# Altium PCB Eth_PoE.PcbDoc (part 1 of 3)
Units mm, origin at the board's own origin, x right, y up, seen from the top; angles counter-clockwise.
Board outline 33 x 53 mm, 2 copper layers (Top Layer, Bottom Layer), stack 0.97 mm thick; 81 components, 62 nets, 294 pads, 109 vias.
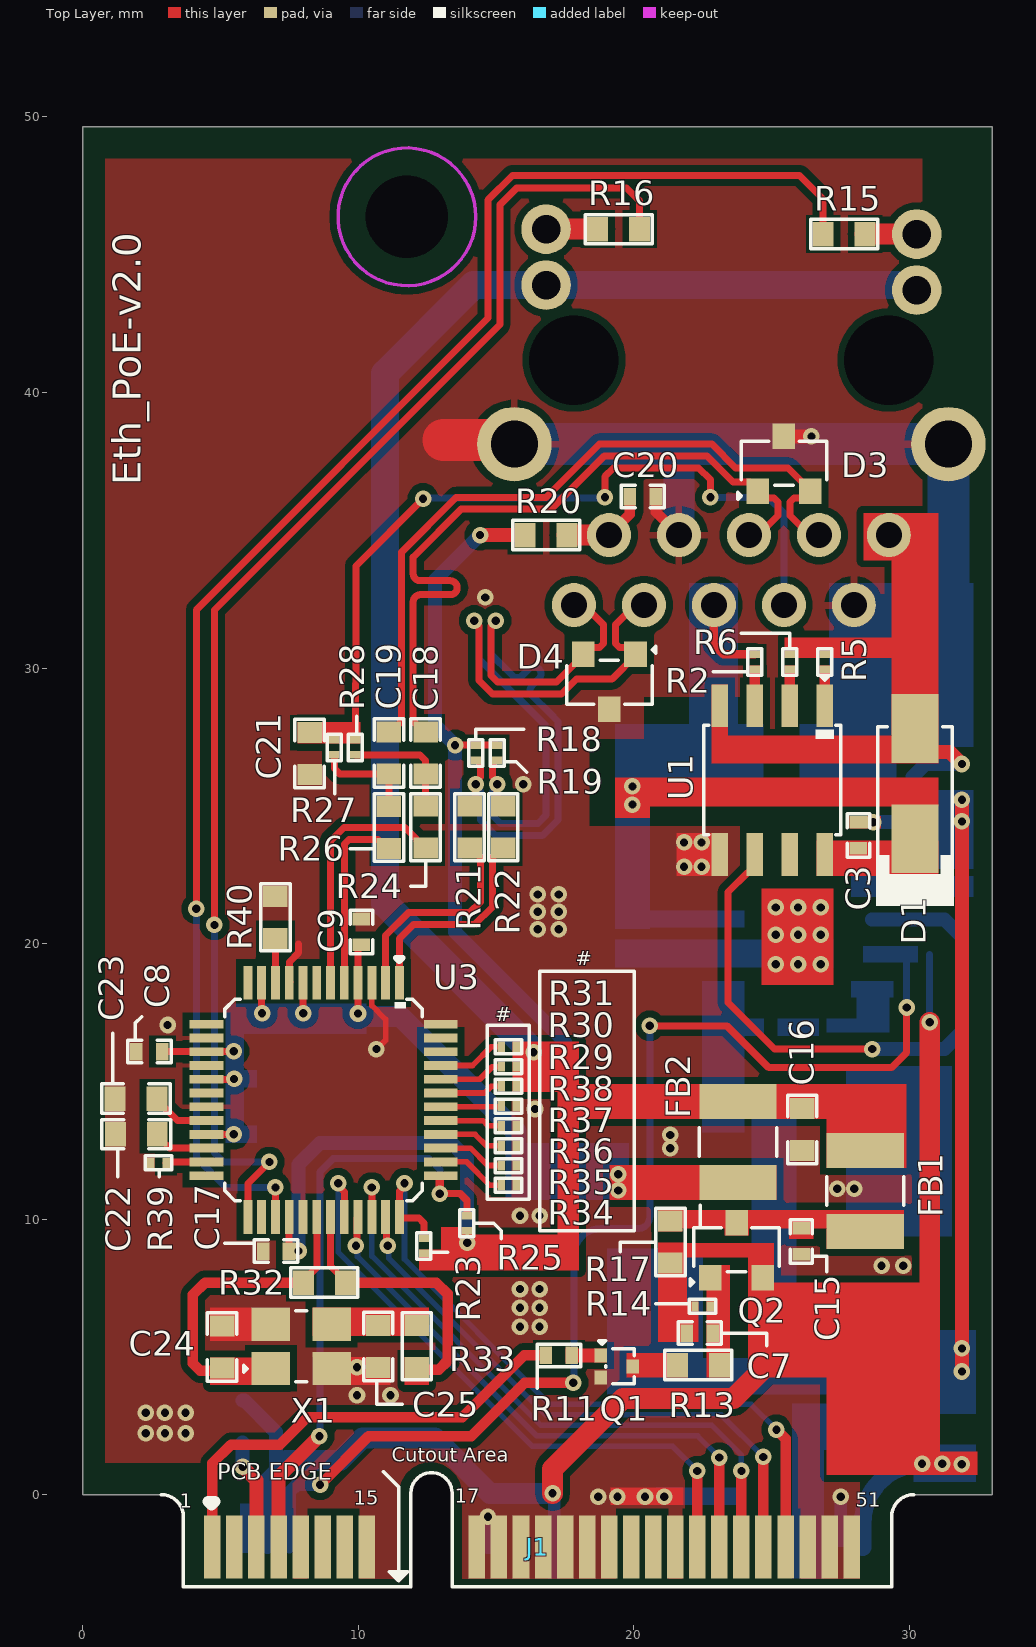
[diagram p0: Top Layer view]
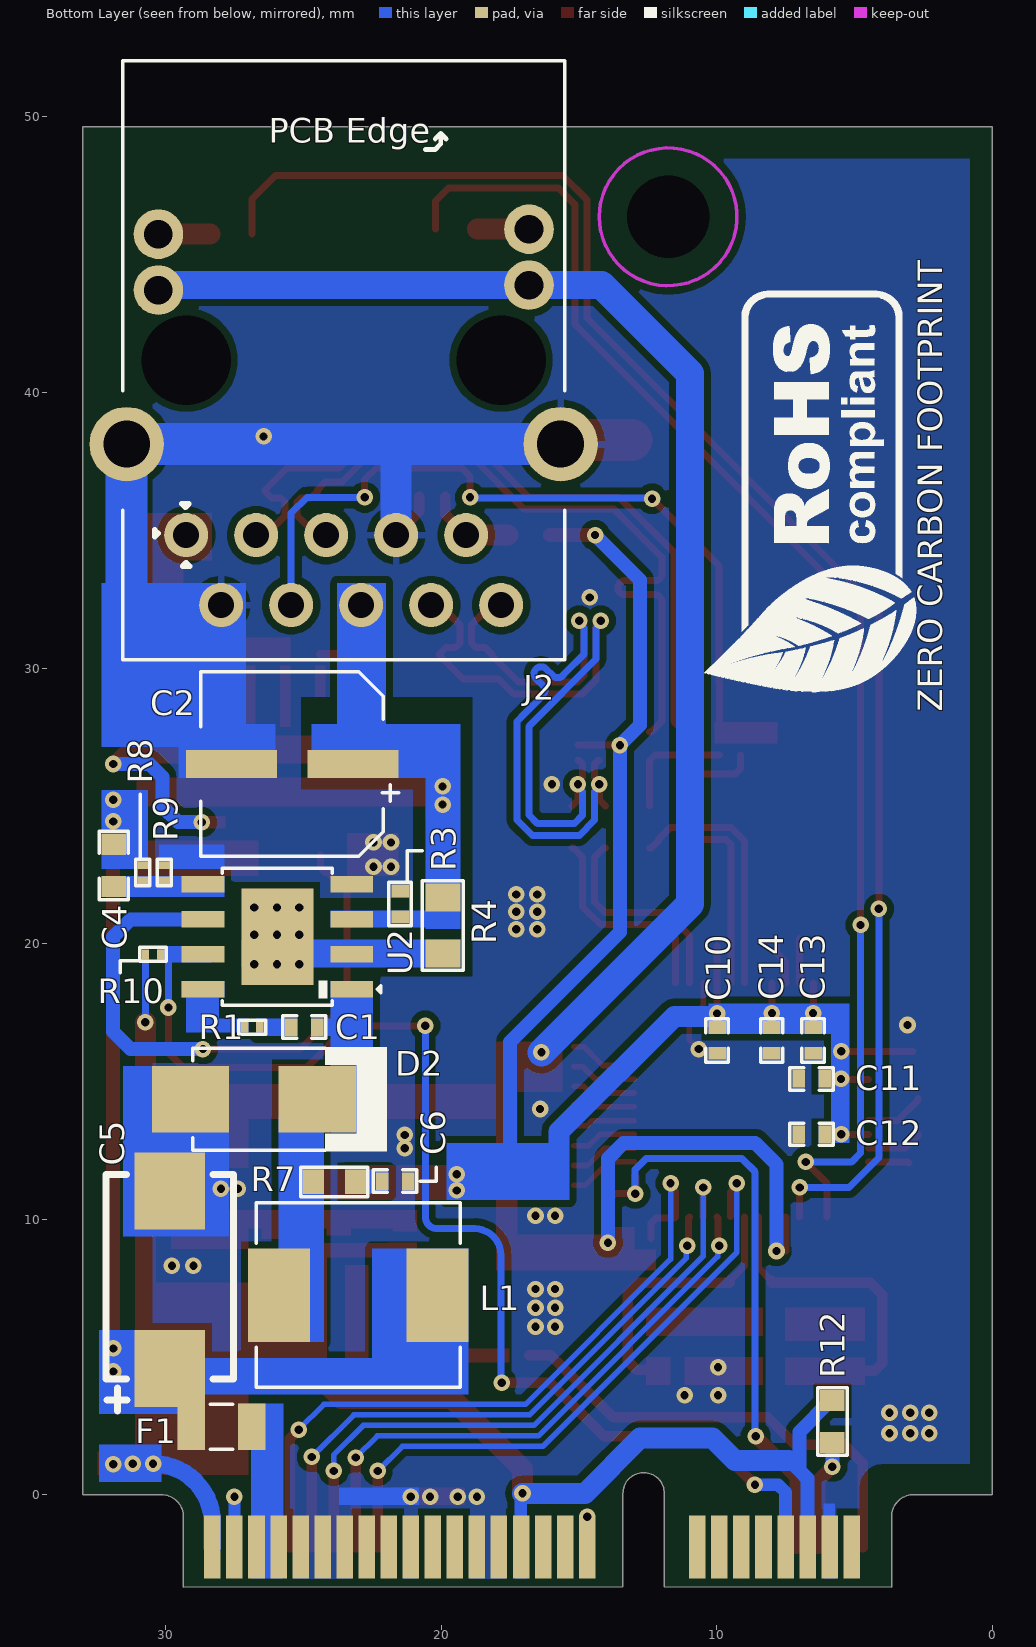
[diagram p1: Bottom Layer view, seen from below]
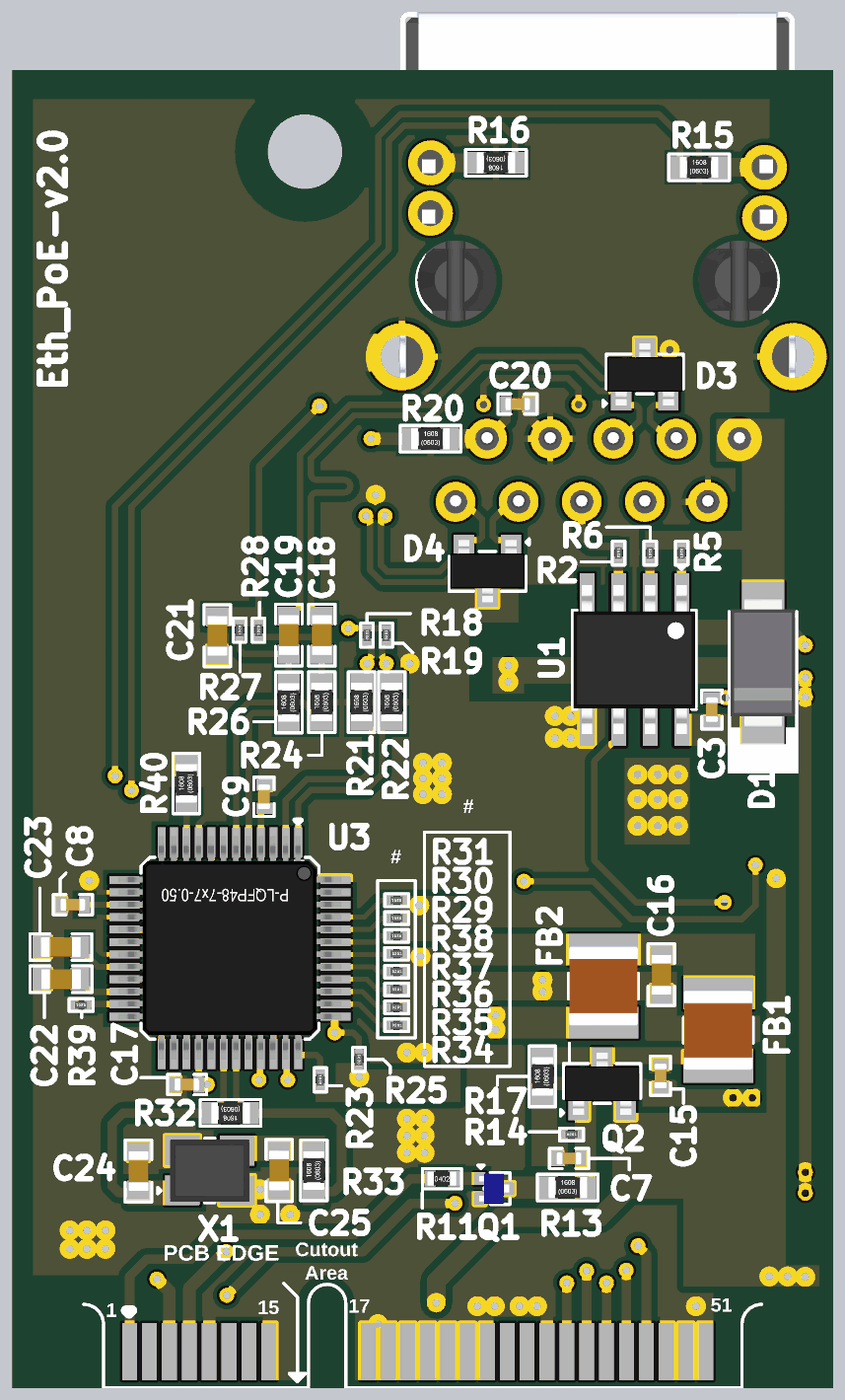
[diagram p3: 3D render of the assembled board from above, using the file's embedded part models]
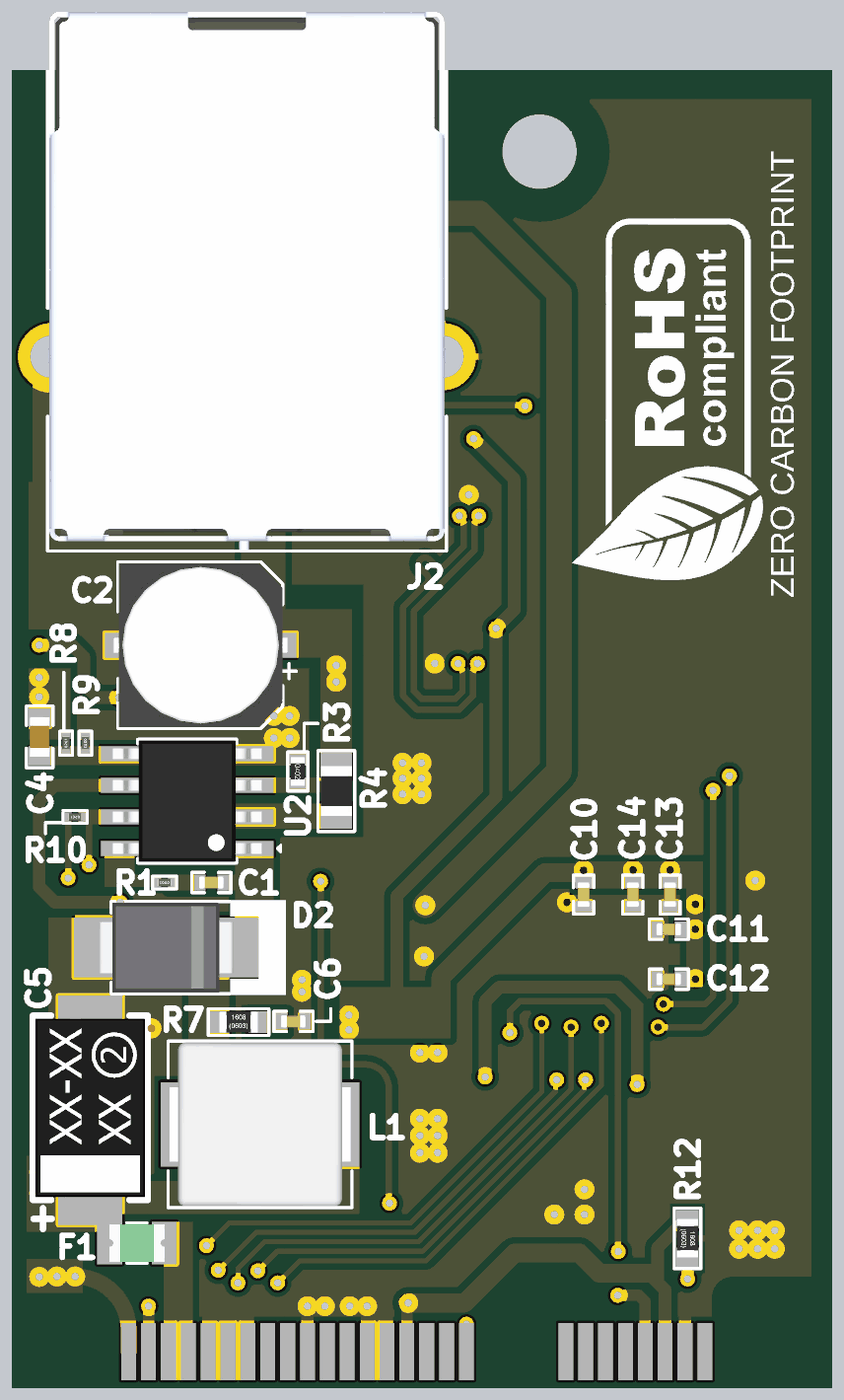
[diagram p4: 3D render of the assembled board from below, using the file's embedded part models]

## Layer stack, top to bottom
Top Solder: solder mask 0.015, Solder Resist, Dk 3.5
Top Layer: signal copper 0.035
Dielectric 1: core 0.9, FR-4, Dk 4.8
Bottom Layer: signal copper 0.035
Bottom Solder: solder mask 0.015, Solder Resist, Dk 3.5

## Board outline
3.65,-3.355 3.65,-0.8 ccw(c2.85,-0.8) 2.85,0 0,0 0,49.642 33,49.642 33,0 30.15,0 ccw(c30.15,-0.8) 29.35,-0.8 29.35,-3.355 13.399,-3.35 13.399,-3.349 13.4,0.051 ccw(c12.65,0.051) 11.9,0.051 11.899,-3.349 11.899,-3.35

## Design rules (kind name [scope] priority, off if disabled: settings)
Clearance Clearance_1 [All] p1: gap=0.178 ignorepadtopadclearanceinfootprint=FALSE except(0.127: Arc-SMDPad Track-SMDPad SMDPad-SMDPad; 0.254: Arc-Fill Arc-Poly Arc-Region Track-Fill Track-Poly Track-Region SMDPad-Fill SMDPad-Poly SMDPad-Region THPad-Fill THPad-Poly THPad-Region Via-Fill Via-Poly Via-Region Fill-Fill Fill-Poly Fill-Region Poly-Poly Poly-Region Region-Region)
DiffPairsRouting [InDifferentialPairClass('EtherCAT_A_Lines')] p1: maxlimit=0.178 minlimit=0.178 mostfreqgap=0.178 toplayer_minwidth=0.254 toplayer_maxwidth=0.254 toplayer_prefwidth=0.254 bottomlayer_minwidth=0.254 bottomlayer_maxwidth=0.254 bottomlayer_prefwidth=0.254 impedanceprofiledriven=TRUE impedanceprofileid={0F1BC98E-E2DE-4F10-A1ED-F719CD41595E} impedanceprofilevalue=100.000000 maxuncoupledlength=25.4
HoleSize [All] p1: absolutevalues=TRUE maxlimit=25.4 minlimit=0.025 maxpercent=80.000 minpercent=20.000
HoleToHoleClearance [All] p1: gap=0 allowstackedmicrovias=TRUE
MatchedLengths "Schematic Matched Net Lengths" [InNetClass('EtherCAT_A')] p1: tolerance=0.508 checknetsindiffpair=FALSE checkdiffpairvsdiffpair=TRUE checkxsignals=TRUE checkothers=TRUE
MaxMinImpedance "Schematic Impedance Constraint" [InNetClass('EtherCAT_A')] p1: minimum=85.00 maximum=95.00
MinimumSolderMaskSliver [All] p1: minsoldermaskwidth=0
PolygonConnect [All] p1: thpad.connectstyle=Relief thpad.reliefconductorwidth=0.254 thpad.reliefentries=4 thpad.polygonreliefangle="90 Angle" thpad.airgapwidth=0.254 smdpad.connectstyle=Direct smdpad.reliefconductorwidth=0.254 smdpad.reliefentries=4 smdpad.polygonreliefangle="90 Angle" smdpad.airgapwidth=0.254 via.connectstyle=Direct via.reliefconductorwidth=0.254 via.reliefentries=4 via.polygonreliefangle="90 Angle" via.airgapwidth=0.254
RoutingVias [All] p1: holewidth=0.3 width=0.6 viastyle="Through Hole" minholewidth=0.3 minwidth=0.6 maxholewidth=0.8 maxwidth=1.6
SilkToSilkClearance [All] p1: silktosilkclearance=0
SilkToSolderMaskClearance [IsPad] p1: minsilkscreentomaskgap=0 clearancetoexposedcopper=TRUE
SolderMaskExpansion [All] p1: expansion=0.102 istentingtop=FALSE
Width [All] p1: maxlimit=2.54 minlimit=0.203 preferedwidth=0.305 minimp=50.000000 maximp=50.000000 favimp=50.000000
24 further rules are at their usual default settings.

## Classes and differential pairs
differential pair class EtherCAT_A_Lines: RD RX TD TX
net class EtherCAT_A: RD_N RD_P TD_N TD_P
component class U_EthPoE_Sheet: C1 C2 C3 C4 C5 C6 D1 D2 F1 J1 L1 R1 R2 R3 R4 R5 R6 R7 R8 R9 R10 R12 SSS U1 U2
component class U_Ethernet_Sheet_W5500: C7 C8 C9 C10 C11 C12 C13 C14 C15 C16 C17 C18 C19 C20 C21 C22 C23 C24 C25 D3 D4 FB1 FB2 J2 Q1 Q2 R11 R13 R14 R15 R16 R17 R18 R19 R20 R21 R22 R23 R24 R25 R26 R27 R28 R29 R30 R31 R32 R33 R34 R35 R36 R37 R38 R39 R40 U3 X1
differential pair TD: +TD_P -TD_N
differential pair RD: +RD_P -RD_N

## Components (designator, comment, footprint, x,y, rotation, side; value= is the part's Value field where it differs from the comment)
C1 "0.1uF" CAP-0402 24.968,16.967 r0 bottom
C2 "15uF" VMMC0571J150MV 25.4,26.518 r0 bottom
C3 "0.1uF" CAP-0402 28.143,23.927 r270 top
C4 "12pF" CAP-0603 31.881,22.83 r90 bottom
C5 "470uF" CASE-E 29.845,4.584 r90 bottom
C6 "220pF" CAP-0402 21.666,11.379 r0 bottom
C7 "22nF" CAP-0402 22.388,5.867 r180 top
C8 "0.1uF" CAP-0402 2.413,16.078 r0 top
C9 "0.1uF" CAP-0402 10.109,20.422 r270 top
C10 "0.1uF" CAP-0402 9.982,16.485 r90 bottom
C11 "0.1uF" CAP-0402 6.553,15.088 r180 bottom
C12 "0.1uF" CAP-0402 6.553,13.081 r180 bottom
C13 "0.1uF" CAP-0402 6.502,16.485 r90 bottom
C14 "0.1uf" CAP-0402 8.001,16.485 r90 bottom
C15 "22nF" CAP-0402 26.07,9.193 r90 top
C16 "10uF" CAP-0603 26.108,13.258 r90 top
C17 "0.1uF" CAP-0402 7.01,8.839 r0 top
C18 "6.8nF" CAP-0603 12.436,26.924 r270 top
C19 "6.8nF" CAP-0603 11.108,26.924 r270 top
C20 "22nF" CAP-0402 20.32,36.22 r180 top
C21 "10nF" CAP-0603 8.23,26.899 r90 top
C22 "10nF" CAP-0603 1.937,13.081 r0 top
C23 "4.7uF" CAP-0603 1.93,14.377 r0 top
C24 "12pF" CAP-0603 5.055,5.36 r270 top
C25 "12pF" CAP-0603 10.719,5.385 r90 top
D1 "SMAJ58A" SMA 30.201,25.806 r90 top
D2 "SS510B" SMB_ 26.797,14.351 r180 bottom
D3 "SP0502BAHTG" SOT-23 25.441,37.414 r0 top
D4 "SP0502BAHTG" SOT-23 19.107,29.501 r180 top
F1 "BSMD0805L-200" FUSE-0805 27.965,2.464 r180 bottom
FB1 "FBMH3225HM601NT" IND-1210 28.397,11.024 r90 top
FB2 "FBMH3225HM601NT" IND-1210 23.774,12.802 r270 top
J1 "Mini PCIe" "MINI PCIE PAD" 4.7,-1.9 r0 top locked
J2 "ARJM11D7-114-AB-EW2" ARJM11D7-114-AB-EW2 23.536,39.106 r0 bottom locked
L1 "33uH" MDA7050_330M 23.012,7.239 r180 bottom
Q1 "MMBT3904M" SOT-723 19.375,4.655 r270 top
Q2 "FDN306P" SOT-23 23.723,8.872 r0 top
R1 "4.7R" RES-0201 26.853,16.967 r0 bottom
R2 "24.9K" RES-0201 24.384,30.226 r90 top value=24.9kR
R3 "4.7K" RES-0402 21.488,21.438 r270 bottom
R4 "30mR" RES-0805 19.939,20.65 r90 bottom
R5 "180K" RES-0201 26.924,30.226 r270 top value=180kR
R6 "4.42K" RES-0201 25.654,30.226 r270 top
R7 "22R" RES-0603 23.876,11.354 r0 bottom
R8 "300K" RES-0201 30.82,22.576 r90 bottom value=300kR
R9 "57.6K" RES-0201 30.045,22.576 r270 bottom value=57.6kR
R10 "10K" RES-0201 30.455,19.609 r0 bottom
R11 "4.7K" Res-0402 17.272,5.055 r0 top
R12 "0R" Res-0603 5.8,2.655 r90 bottom
R13 "1K" RES-0603 22.337,4.699 r180 top
R14 "10K" RES-0201 22.49,6.833 r0 top
R15 "330R" RES-0603 27.626,45.746 r180 top
R16 "330R" RES-0603 19.446,45.926 r0 top
R17 "0R" RES-0603 21.321,9.167 r270 top
R18 "49.9R" RES-0201 14.257,26.924 r90 top
R19 "49.9R" RES-0201 15.034,26.924 r90 top
R20 "10R" RES-0603 16.815,34.826 r180 top
R21 "33R" RES-0603 14.036,24.224 r270 top
R22 "33R" RES-0603 15.255,24.224 r270 top
R23 "10K" RES-0201 12.378,9.03 r90 top
R24 "33R" RES-0603 12.436,24.224 r270 top
R25 "10K" RES-0201 13.931,9.851 r90 top
R26 "33R" RES-0603 11.108,24.214 r270 top
R27 "49.9R" RES-0201 9.126,27.123 r270 top
R28 "49.9R" RES-0201 9.888,27.123 r270 top
R29 "10K" RES-0201 15.453,14.819 r180 top
R30 "10K" RES-0201 15.453,15.538 r180 top
R31 "10K" RES-0201 15.453,16.256 r180 top
R32 "1M" RES-0603 8.763,7.696 r0 top
R33 "0R" RES-0603 12.116,5.385 r270 top
R34 "10K" RES-0201 15.453,11.227 r0 top
R35 "10K" RES-0201 15.453,11.945 r0 top
R36 "10K" RES-0201 15.453,12.664 r0 top
R37 "10K" RES-0201 15.453,13.382 r0 top
R38 "10K" RES-0201 15.453,14.101 r0 top
R39 "10K" RES-0201 2.743,12.04 r180 top
R40 "12.4K" RES-0603 6.985,20.955 r270 top
U1 "TPS2375DR" SOIC-8 25.019,25.933 r270 top
U2 "TX4138" 8-SOIC-EP 25.943,20.244 r0 bottom
U3 "W5500" "48-LQFP (7X7)_" 8.738,14.326 r270 top locked
X1 "25MHZ" NX3225GA-25MHZ-STD-CRG-2 7.925,5.385 r0 top

## Footprints (in the part's own frame and the unit in brackets; to place one, negate y for a bottom-side part, rotate by r counter-clockwise, add the part's x,y. Pads: shape width x height; smd on the part's side, far side on the other; paste and mask are expansions set on the pad)
8-SOIC-EP [mm]
  rect 1.55x0.6 smd: 1(-2.7,1.905) 2(-2.7,0.635) 3(-2.7,-0.635) 4(-2.7,-1.905) 5(2.7,-1.905) 6(2.7,-0.635) 7(2.7,0.635) 8(2.7,1.905)
  rect 2.613x3.502 smd: 9(0,0)
  silkscreen extent -3.76,-2.49 1.99,2.49, body extent -3,-2.45 3,2.45, height 1.7
"48-LQFP (7X7)_" [mm]
  rect 1.22x0.32 smd: 1(-4.25,2.75) 2(-4.25,2.25) 3(-4.25,1.75) 4(-4.25,1.25) 5(-4.25,0.75) 6(-4.25,0.25) 7(-4.25,-0.25) 8(-4.25,-0.75) 9(-4.25,-1.25) 10(-4.25,-1.75) 11(-4.25,-2.25) 12(-4.25,-2.75) 25(4.25,-2.75) 26(4.25,-2.25) 27(4.25,-1.75) 28(4.25,-1.25) 29(4.25,-0.75) 30(4.25,-0.25) 31(4.25,0.25) 32(4.25,0.75) 33(4.25,1.25) 34(4.25,1.75) 35(4.25,2.25) 36(4.25,2.75)
  rect 0.32x1.22 smd: 13(-2.75,-4.25) 14(-2.25,-4.25) 15(-1.75,-4.25) 16(-1.25,-4.25) 17(-0.75,-4.25) 18(-0.25,-4.25) 19(0.25,-4.25) 20(0.75,-4.25) 21(1.25,-4.25) 22(1.75,-4.25) 23(2.25,-4.25) 24(2.75,-4.25) 37(2.75,4.25) 38(2.25,4.25) 39(1.75,4.25) 40(1.25,4.25) 41(0.75,4.25) 42(0.25,4.25) 43(-0.25,4.25) 44(-0.75,4.25) 45(-1.25,4.25) 46(-1.75,4.25) 47(-2.25,4.25) 48(-2.75,4.25)
  silkscreen extent -5.16,-3.58 3.66,3.58, body extent -4.51,-4.51 4.49,4.49, height 1.43
ARJM11D7-114-AB-EW2 [mm]
  round 1.6 hole 0.94: 1(5.715,4.28) 2(4.445,6.82) 3(3.175,4.28) 4(1.905,6.82) 5(0.635,4.28) 6(-0.635,6.82) 7(-1.905,4.28) 8(-3.175,6.82) 9(-4.445,4.28) 10(-5.715,6.82)
  round 1.8 hole 1.04: 11(6.725,-4.61) 12(6.725,-6.64) 13(-6.725,-4.79) 14(-6.725,-6.82)
  round 0 hole 3.25 unplated: MH1(-5.715,-2.07) MH2(5.715,-2.07)
  round 2.7 hole 1.7: SH1(-7.875,0.98) SH2(7.875,0.98)
  silkscreen extent -8.03,-12.93 8.03,8.8, body extent -7.99,-12.9 7.99,8.75, height 13.8
CAP-0402 [mil]
  rect 18x25 smd mask+2.36: 1(-18.5,0) 2(18.5,0)
  silkscreen extent -31,-16 31,16, body extent -20,-10 20,10, height 19
CAP-0603 [mil]
  rect 30x35 smd mask+2.36: 1(-30,0) 2(30,0)
  silkscreen extent -49,-21 49,21, body extent -32,-16 31,16, height 34
CASE-E [mm]
  rect 2.79x2.57 smd: 1(0,0) 2(6.44,0)
  silkscreen extent -1.56,-2.31 7.03,2.31, body extent -0.27,-2.21 6.92,2.21, height 2.88
FUSE-0805 [mm]
  rect 1x1.7 smd: 1(-1.1,0) 2(1.1,0)
  silkscreen extent -0.41,-0.81 0.41,0.81, body extent -1.1,-0.75 1.1,0.75, height 1.24
IND-1210 [mm]
  rect 1.27x2.81 smd: 1(-1.471,0) 2(1.471,0)
  silkscreen extent -0.52,-1.4 0.52,1.4, body extent -1.6,-1.4 1.6,1.4, height 2.5
MDA7050_330M [mm]
  rect 2.25x3.4 smd: 1(-2.875,0) 2(2.875,0)
  silkscreen extent -3.7,-3.35 3.7,3.35, body extent -3.65,-3.3 3.65,3.3, height 4.5
"MINI PCIE PAD" [mm]
  rect 0.6x2.3 smd: 1(0,0) 3(0.8,0) 5(1.6,0) 7(2.4,0) 9(3.2,0) 11(4,0) 13(4.8,0) 15(5.6,0) 17(9.6,0) 19(10.4,0) 21(11.2,0) 23(12,0) 25(12.8,0) 27(13.6,0) 29(14.4,0) 31(15.2,0) 33(16,0) 35(16.8,0) 37(17.6,0) 39(18.4,0) 41(19.2,0) 43(20,0) 45(20.8,0) 47(21.6,0) 49(22.4,0) 51(23.2,0)
  rect 0.6x2.3 smd far side: 2(0.4,0) 4(1.2,0) 6(2,0) 8(2.8,0) 10(3.6,0) 12(4.4,0) 14(5.2,0) 16(6,0) 18(10,0) 20(10.8,0) 22(11.6,0) 24(12.4,0) 26(13.2,0) 28(14,0) 30(14.8,0) 32(15.6,0) 34(16.4,0) 36(17.2,0) 38(18,0) 40(18.8,0) 42(19.6,0) 44(20.4,0) 46(21.2,0) 48(22,0) 50(22.8,0) 52(23.6,0)
  silkscreen extent -1.85,-1.45 25.45,2.74
NX3225GA-25MHZ-STD-CRG-2 [mm]
  rect 1.4x1.2 smd: 1(-1.1,-0.8) 2(1.1,-0.8) 3(1.1,0.8) 4(-1.1,0.8)
  silkscreen extent -2.09,-1.3 0.2,1.3, body extent -1.6,-1.26 1.6,1.24, height 0.8
RES-0201 [mm]
  rect 0.27x0.37 smd mask+0.055: 1(-0.275,0) 2(0.275,0)
  silkscreen extent -0.48,-0.25 0.48,0.25, body extent -0.3,-0.15 0.3,0.15, height 0.29
RES-0402 [mil]
  rect 18x25 smd mask+2.17: 1(-18.5,0) 2(18.5,0)
  silkscreen extent -32,-17 32,16, body extent -23,-11 23,11, height 16
Res-0402 [mil]
  rect 18x25 smd mask+2.17: 1(-18.5,0) 2(18.5,0)
  silkscreen extent -32,-17 32,16, body extent -23,-11 23,11, height 16
RES-0603 [mil]
  rect 30x35 smd: 1(-30,0) 2(30,0)
  silkscreen extent -48,-21 48,21, body extent -31,-17 31,17, height 18
Res-0603 [mil]
  rect 30x35 smd: 1(-30,0) 2(30,0)
  silkscreen extent -48,-21 48,21, body extent -31,-17 31,17, height 18
RES-0805 [mil] "SMD 0805"
  rect 40x50 smd: 1(-40,0) 2(40,0)
  silkscreen extent -64,-29 64,29, body extent -39,-25 39,24, height 24
SMA [mm]
  rect 2.5x1.7 smd: 1(-2,0) 2(2,0)
  silkscreen extent -4.45,-1.42 2.06,1.42, body extent -2.6,-1.3 2.6,1.3, height 2.4
SMB_ [mm]
  rect 2.8x2.4 smd: 1(-2.3,0) 2(2.3,0)
  silkscreen extent -2.21,-1.9 4.83,1.91, body extent -2.7,-1.8 2.7,1.8, height 2.3
SOIC-8 [mm]
  rect 1.55x0.6 smd: 1(-2.7,1.905) 2(-2.7,0.635) 3(-2.7,-0.635) 4(-2.7,-1.905) 5(2.7,-1.905) 6(2.7,-0.635) 7(2.7,0.635) 8(2.7,1.905)
  silkscreen extent -3.76,-2.49 1.99,2.49, body extent -3,-2.45 3,2.45, height 1.7
SOT-23 [mm] "TRANS NPN 40V 0.6A SOT23"
  rect 0.82x0.92 smd: 1(-0.95,-1) 2(0.95,-1) 3(0,1)
  silkscreen extent -1.68,-1.3 1.55,0.81, body extent -1.5,-1.25 1.5,1.25, height 1.05
SOT-723 [mm]
  rect 0.5x0.45 smd: 1(-0.4,-0.575) 2(0.4,-0.575) 3(0,0.575)
  silkscreen extent -0.94,-0.66 0.64,0.64, body extent -0.6,-0.6 0.6,0.6, height 0.5
VMMC0571J150MV [mm]
  rect 3.3x1 smd: 1(-2.2,0) 2(2.2,0)
  silkscreen extent -3.86,-3.35 3.33,3.35, body extent -3.5,-3.3 3.5,3.3, height 5.7

## Part data
C1 C3 C8 C9 C10 C11 C12 C13 C14 C17: library part GRM155R62A104KE14D, "CAP CER 0.1UF 100V X5R 0402", Capacitance=100nF, Case Code (Imperial)=0402, Case Code (Metric)=1005, Dielectric=X5R, LCSC Part Number=C162178, Manufacturer=Murata, Max Operating Temperature=85°C, Min Operating Temperature=-55°C, Package Quantity=10000, Tolerance=10%, Voltage Rating=100V, Case/Package=0402, Category="Ceramic Capacitors", ComponentLink1Description=http://www.farnell.com/datasheets/2079151.pdf?src-supplier=Farnell, ComponentLink1URL=http://www.farnell.com/datasheets/2079151.pdf?src-supplier=Farnell, ComponentLink2Description=http://www.mouser.com/ds/2/281/c02e-2905.pdf?src-supplier=Mouser, ComponentLink2URL=http://www.mouser.com/ds/2/281/c02e-2905.pdf?src-supplier=Mouser, ComponentLink3Description=http://www.farnell.com/datasheets/2079151.pdf?src-supplier=Element14, ComponentLink3URL=http://www.farnell.com/datasheets/2079151.pdf?src-supplier=Element14, ComponentLink4Description=http://search.murata.co.jp/Ceramy/image/img/A01X/G101/ENG/GRM155R62A104KE14-01.pdf?src-supplier=Digi-Key, ComponentLink4URL=http://search.murata.co.jp/Ceramy/image/img/A01X/G101/ENG/GRM155R62A104KE14-01.pdf?src-supplier=Digi-Key, ComponentLink5Description=http://www.farnell.com/datasheets/2079151.pdf?src-supplier=Newark, ComponentLink5URL=http://www.farnell.com/datasheets/2079151.pdf?src-supplier=Newark, Height=0.5mm, Item Type=Capacitor, Lead Free="Lead Free", Length=0.039inch, Manufacturer Part Number=GRM155R62A104KE14D, Mount="Surface Mount", Packaging="Tape and Reel", Pricing 1="10000=0.00500, 20000=0.00410, 30000=0.00390, 50000=0.00370, 100000=0.00300 (USD)", Reach SVHC Compliant=Yes, RoHS=Yes, RoHS Compliant=Yes, Series=GRM, Stock 1=870000, Supplier 1="Arrow Electronics", Supplier Part Number 1=GRM155R62A104KE14D, Termination=SMD/SMT, Thickness=0.022inch, Voltage Rating (DC)=100V, Weight=0.000212oz, Width=0.02inch
C2: library part VMMC0571J150MV, "15uF 63V ±20% SMD,D6.3xL5.7mm Aluminum Electrolytic Capacitors - SMD ROHS", LCSC Part Number=C487115, Manufacturer=Ymin, Package=SMD,D6.3xL5.7mm, ComponentLink1Description=LCSC, ComponentLink1URL=https://www.lcsc.com/product-detail/Aluminum-Electrolytic-Capacitors-SMD_Ymin-VMMC0571J150MV_C487115.html, Item Type=Capacitor, Manufacturer Part Number=VMMC0571J150MV
C4 C24 C25: library part GCM1885C2A120JA16D, "CAP CER 12PF 100V C0G/NP0 0603", Case Code (Imperial)=0603, Case Code (Metric)=1608, Dielectric=C0G, LCSC Part Number=C701298, Manufacturer=Murata, Max Operating Temperature=125°C, Min Operating Temperature=-55°C, Package Quantity=4000, Ratings=AEC-Q200, Tolerance=5%, Voltage Rating=100V, Capacitance=12pF, Case/Package=0603, Category="Ceramic Capacitors", ComponentLink1Description=https://datasheet.ciiva.com/26843/getdatasheetpartid-298064-26843669.pdf?src-supplier=Verical, ComponentLink1URL=https://datasheet.ciiva.com/26843/getdatasheetpartid-298064-26843669.pdf?src-supplier=Verical, ComponentLink2Description=https://datasheet.ciiva.com/29541/s0717e-29541093.pdf?src-supplier=Digi-Key, ComponentLink2URL=https://datasheet.ciiva.com/29541/s0717e-29541093.pdf?src-supplier=Digi-Key, ComponentLink3Description=https://datasheet.ciiva.com/29541/s0717e-29541094.pdf?src-supplier=Digi-Key, ComponentLink3URL=https://datasheet.ciiva.com/29541/s0717e-29541094.pdf?src-supplier=Digi-Key, ComponentLink4Description=https://datasheet.ciiva.com/29541/s0717e-29541095.pdf?src-supplier=Digi-Key, ComponentLink4URL=https://datasheet.ciiva.com/29541/s0717e-29541095.pdf?src-supplier=Digi-Key, Construction=Flat, Depth=0.8mm, Height=0.8mm, Lead Free="Lead Free", Length=1.6mm, Manufacturer Part Number=GCM1885C2A120JA16D, Mount="Surface Mount", Packaging="Tape and Reel", Pricing 1="4000=0.02030, 8000=0.01800, 12000=0.01680, 28000=0.01670, 100000=0.01630 (USD)", Radiation Hardening=No, RoHS=Yes, RoHS Compliant=Yes, Series=GCM, Stock 1=12000, Supplier 1="Arrow Electronics", Supplier Part Number 1=GCM1885C2A120JA16D, Termination=SMD/SMT, Thickness=0.035inch, Voltage Rating (DC)=100V, Width=0.031inch
C5: library part TAJE477K010RNJ, "CAP TANT 470UF 10% 10V 2917", Case Code (Imperial)=2917, Case Code (Metric)=7343, Dielectric Material=Tantalum, ESR (Equivalent Series Resistance)=500mR, LCSC Part Number=C7234, Leakage Current=47uA, Manufacturer="Kyocera AVX", Max Operating Temperature=125°C, Min Operating Temperature=-55°C, Package Quantity=400, Tolerance=10%, Voltage=10V, Case/Package=2917, Category="Tantalum Capacitors", ComponentLink1Description=https://datasheet.ciiva.com/7832/taj-7832508.pdf?src-supplier=Element14, ComponentLink1URL=https://datasheet.ciiva.com/7832/taj-7832508.pdf?src-supplier=Element14, ComponentLink2Description=https://datasheet.ciiva.com/7832/taj-7832507.pdf?src-supplier=Element14, ComponentLink2URL=https://datasheet.ciiva.com/7832/taj-7832507.pdf?src-supplier=Element14, ComponentLink3Description=https://datasheet.ciiva.com/265/taj-265547.pdf?src-supplier=Digi-Key, ComponentLink3URL=https://datasheet.ciiva.com/265/taj-265547.pdf?src-supplier=Digi-Key, ComponentLink4Description=https://datasheet.ciiva.com/265/taj-265546.pdf?src-supplier=Digi-Key, ComponentLink4URL=https://datasheet.ciiva.com/265/taj-265546.pdf?src-supplier=Digi-Key, ComponentLink5Description=https://datasheet.ciiva.com/265/taj-265548.pdf?src-supplier=Digi-Key, ComponentLink5URL=https://datasheet.ciiva.com/265/taj-265548.pdf?src-supplier=Digi-Key, ComponentLink6Description=https://datasheet.ciiva.com/12882/taj-27497-12882504.pdf?src-supplier=Mouser, ComponentLink6URL=https://datasheet.ciiva.com/12882/taj-27497-12882504.pdf?src-supplier=Mouser, ComponentLink7Description=https://datasheet.ciiva.com/14602/70001050-14602312.pdf?src-supplier=Allied+Electronics, ComponentLink7URL=https://datasheet.ciiva.com/14602/70001050-14602312.pdf?src-supplier=Allied+Electronics, ComponentLink8Description=https://datasheet.ciiva.com/14600/70001050-14600301.pdf?src-supplier=Allied+Electronics, ComponentLink8URL=https://datasheet.ciiva.com/14600/70001050-14600301.pdf?src-supplier=Allied+Electronics, ComponentLink9Description=https://datasheet.ciiva.com/11229/taj-11229470.pdf?src-supplier=Avnet, ComponentLink9URL=https://datasheet.ciiva.com/11229/taj-11229470.pdf?src-supplier=Avnet, ComponentLink10Description=https://datasheet.ciiva.com/16330/taj-16330918.pdf?src-supplier=Future+Electronics, ComponentLink10URL=https://datasheet.ciiva.com/16330/taj-16330918.pdf?src-supplier=Future+Electronics, Construction=Flat, Depth=4.3mm, Dissipation Factor=10%, Features="General Purpose", Height=4.1mm, Item Type=Capacitor, Lead Free="Lead Free", Lead Pitch=4.4mm, Length=7.3mm, Manufacturer Part Number=TAJE477K010RNJ, Mounting Technology="Surface Mount,PCB", Packaging="Tape and Reel", Pins=2, Polarity=Polar, Pricing 1="1=1.3181 (USD)", Radiation Hardening=No, Reach SVHC Compliant=No, RoHS=Yes, RoHS Compliant=Yes, Series=TAJ, Stock 1=5, Supplier 1="Arrow Electronics", Supplier Part Number 1=TAJE477K010RNJ, Termination=SMD/SMT, Voltage Rating=10V, Voltage Rating (DC)=10V, Width=4.3mm
C6: library part CC0402JRNPO9BN221, "CAP CER 220PF 50V C0G/NPO 0402", Case Code (Imperial)=0402, Case Code (Metric)=1005, Dielectric=C0G, Dielectric Material=Ceramic, Insulation Resistance=10GR, LCSC Part Number=C107001, Manufacturer=Yageo, Max Operating Temperature=125°C, Min Operating Temperature=-55°C, Package Quantity=1, Supplier Part Number 1=6169284, Temperature Coefficient=30ppm/°C, Tolerance=10%, Voltage=50V, Capacitance=220pF, Case/Package=0402, Category="Ceramic Capacitors", ComponentLink1Description=https://datasheet.ciiva.com/11786/0900766b8079c870-11786154.pdf?src-supplier=RSComponents, ComponentLink1URL=https://datasheet.ciiva.com/11786/0900766b8079c870-11786154.pdf?src-supplier=RSComponents, ComponentLink2Description=https://datasheet.ciiva.com/7656/1132289-7656616.pdf?src-supplier=Element14, ComponentLink2URL=https://datasheet.ciiva.com/7656/1132289-7656616.pdf?src-supplier=Element14, ComponentLink3Description=https://datasheet.ciiva.com/8033/1443161-8033609.pdf?src-supplier=Element14, ComponentLink3URL=https://datasheet.ciiva.com/8033/1443161-8033609.pdf?src-supplier=Element14, ComponentLink4Description=https://datasheet.ciiva.com/8033/1443161-8033608.pdf?src-supplier=Element14, ComponentLink4URL=https://datasheet.ciiva.com/8033/1443161-8033608.pdf?src-supplier=Element14, ComponentLink5Description=https://datasheet.ciiva.com/176/mlccorderingcode-176384.pdf?src-supplier=Digi-Key, ComponentLink5URL=https://datasheet.ciiva.com/176/mlccorderingcode-176384.pdf?src-supplier=Digi-Key, ComponentLink6Description=https://datasheet.ciiva.com/176/mlccorderingcode-176383.pdf?src-supplier=Digi-Key, ComponentLink6URL=https://datasheet.ciiva.com/176/mlccorderingcode-176383.pdf?src-supplier=Digi-Key, ComponentLink7Description=https://datasheet.ciiva.com/176/mlccorderingcode-176385.pdf?src-supplier=Digi-Key, ComponentLink7URL=https://datasheet.ciiva.com/176/mlccorderingcode-176385.pdf?src-supplier=Digi-Key, ComponentLink8Description=https://datasheet.ciiva.com/17434/upy-gp-np0-16v-to-50v-8-17434343.pdf?src-supplier=Avnet+Europe, ComponentLink8URL=https://datasheet.ciiva.com/17434/upy-gp-np0-16v-to-50v-8-17434343.pdf?src-supplier=Avnet+Europe, Depth=0.5mm, Dissipation Factor=0.1%, Height=0.5mm, Lead Free="Lead Free", Length=1mm, Manufacturer Part Number=CC0402JRNPO9BN221, Mount="Surface Mount", Number of Pins=2, Packaging="Tape and Reel", Pricing 1="10000=0.00600, 100000=0.00600 (GBP)", Radiation Hardening=No, REACH SVHC="No SVHC", RoHS=Yes, RoHS Compliant=Yes, Series=CC, Stock 1=20000, Supplier 1=RSComponents, Termination=SMD/SMT, Thickness=0.022inch, Voltage Rating=50V, Width=0.02inch
C7 C15 C20: library part CC0402KRX5R7BB223, "CAP CER 0.022UF 16V X5R 0402", Case Code (Imperial)=0402, Case Code (Metric)=1005, Dielectric=X5R, LCSC Part Number=C541399, Manufacturer=Yageo, Max Operating Temperature=85°C, Min Operating Temperature=-55°C, Supplier Part Number 1=603-CC402KRX5R7BB223, Tolerance=10%, Voltage Rating=16V, Capacitance=22nF, Case/Package=0402, Category="Ceramic Capacitors", ComponentLink1Description=http://www.yageo.com/exep/pages/download/literatures/ProductSelectionGuide%202014_Final_2.pdf?src-supplier=Digi-Key, ComponentLink1URL=http://www.yageo.com/exep/pages/download/literatures/ProductSelectionGuide%202014_Final_2.pdf?src-supplier=Digi-Key, ComponentLink2Description=http://www.yageo.com/documents/recent/UPY-GPHC_X5R_4V-to-50V_25.pdf?src-supplier=Digi-Key, ComponentLink2URL=http://www.yageo.com/documents/recent/UPY-GPHC_X5R_4V-to-50V_25.pdf?src-supplier=Digi-Key, Halogen Free="Halogen Free", Lead Free="Lead Free", Length=0.039inch, Manufacturer Part Number=CC0402KRX5R7BB223, Mount="Surface Mount", Packaging="Tape and Reel", Pricing 1="1=0.10000, 10=0.05600, 50=0.05600, 100=0.02500, 1000=0.01400, 10000=0.01000 (USD)", RoHS=Yes, RoHS Compliant=Yes, Stock 1=31160, Supplier 1=Mouser, Thickness=0.022inch, Voltage Rating (DC)=16V, Width=0.02inch
C16: library part C1608X5R1E106M080AC, "CAP CER 10UF 25V X5R 0603", Case Code (Imperial)=0603, Case Code (Metric)=1608, Dielectric=X5R, Dielectric Material=Ceramic, LCSC Part Number=C2168289, Manufacturer=TDK, Max Operating Temperature=85°C, Min Operating Temperature=-55°C, Package Quantity=1, Supplier Part Number 1=445-9015-1-ND, Tolerance=20%, Voltage Rating=25V, Capacitance=10uF, Case/Package=0603, Composition=Ceramic, Depth=0.8mm, Height=0.8mm, Lead Free="Lead Free", Length=1.6mm, Manufacturer Part Number=C1608X5R1E106M080AC, Mount="Surface Mount", Packaging="Tape and Reel", Pricing 1="1=0.96, 10=0.704, 100=0.483, 500=0.38238, 1000=0.322 (USD)", REACH SVHC="No SVHC", Stock 1=61681, Supplier 1=Digi-Key, Termination=SMD/SMT, Thickness=0.039inch, Voltage Rating (DC)=25V, Weight=7.1E-05oz, Width=0.8mm
C18 C19: library part 0603B682K500NT, "50V 6.8nF X7R ±10% 0603", LCSC Part Number=C1631, Manufacturer=FH, ComponentLink1Description=LCSC, ComponentLink1URL=https://www.lcsc.com/product-detail/Multilayer-Ceramic-Capacitors-MLCC-SMD-SMT_FH-Guangdong-Fenghua-Advanced-Tech-0603B682K500NT_C1631.html, Item Type=Capacitor, Manufacturer Part Number=0603B682K500NT
C21 C22: library part AC0603KRX7R0BB103, "CAP CER 10000PF 100V X7R 0603", Case Code (Imperial)=0603, Case Code (Metric)=1608, LCSC Part Number=C149602, Manufacturer=Yageo, Max Operating Temperature=125°C, Min Operating Temperature=-55°C, Ratings=AEC-Q200, Supplier Part Number 1=1985307, Tolerance=10%, Voltage Rating=100V, Capacitance=10nF, Case/Package=0603, Category="Ceramic Capacitors", ComponentLink1Description=http://www.yageo.com/NewPortal/_en/search/productDocs.jsp?YageoPartNumber=AC0603KRX7R0BB103&src-supplier=Digi-Key, ComponentLink1URL=http://www.yageo.com/NewPortal/_en/search/productDocs.jsp?YageoPartNumber=AC0603KRX7R0BB103&src-supplier=Digi-Key, ComponentLink2Description=https://www.yageo.com/upload/media/product/productsearch/datasheet/mlcc/UPY-AC_NP0X7R_16V-to-630V_12.pdf?src-supplier=Digi-Key, ComponentLink2URL=https://www.yageo.com/upload/media/product/productsearch/datasheet/mlcc/UPY-AC_NP0X7R_16V-to-630V_12.pdf?src-supplier=Digi-Key, Item Type=Capacitor, Lead Free="Lead Free", Manufacturer Part Number=AC0603KRX7R0BB103, Mount="Surface Mount", Packaging="Tape and Reel", Pricing 1="250=0.02700, 1000=0.02500, 2000=0.02100 (GBP)", RoHS=Yes, RoHS Compliant=Yes, Stock 1=750, Supplier 1=RSComponents
C23: library part C1608X5R1E475KT000E, "CAP CER, 4.7 µF, 25 V, 0603", Case Code (Imperial)=0603, Case Code (Metric)=1608, Dielectric=X5R, Dielectric Material=Ceramic, LCSC Part Number=C76615, Manufacturer=TDK, Max Operating Temperature=85°C, Min Operating Temperature=-55°C, Package Quantity=4000, Supplier Part Number 1=2220Y1000562GCT-ND, Tolerance=10%, Voltage Rating=25V, Capacitance=4.7uF, Case/Package=0603, Category="Ceramic Capacitors", ComponentLink1Description=https://datasheet.ciiva.com/48587/6print-detail-pdf-phplangenpart-noc1608x5r1e475k080acimp-unit-xmhz-48587141.pdf?src-supplier=Onlinecomponents.com, ComponentLink1URL=https://datasheet.ciiva.com/48587/6print-detail-pdf-phplangenpart-noc1608x5r1e475k080acimp-unit-xmhz-48587141.pdf?src-supplier=Onlinecomponents.com, ComponentLink2Description=https://datasheet.ciiva.com/24216/mlcc-commercial-general-en-24216326.pdf?src-supplier=Mouser, ComponentLink2URL=https://datasheet.ciiva.com/24216/mlcc-commercial-general-en-24216326.pdf?src-supplier=Mouser, ComponentLink3Description=https://datasheet.ciiva.com/48671/mlcc-commercial-general-en-48671304.pdf?src-supplier=Avnet, ComponentLink3URL=https://datasheet.ciiva.com/48671/mlcc-commercial-general-en-48671304.pdf?src-supplier=Avnet, Depth=0.8mm, Height=0.8mm, Lead Free="Lead Free", Length=1.6mm, Manufacturer Part Number=C1608X5R1E475KT000E, Mount="Surface Mount", Packaging="Tape and Reel", Pricing 2="100=0.23400, 200=0.21900, 1000=0.20700, 2000=0.18700 (GBP)", REACH SVHC="No SVHC", Resistor Type=Ceramic, RoHS=No, Stock 2=16120, Supplier 1=Digi-Key, Supplier 2=RSComponents, Supplier Part Number 2=9159158P, Termination=SMD/SMT, Thickness=0.039inch, Voltage Rating (DC)=25V, Weight=7.1E-05oz, Width=0.031inch
D1: "93.6V 64.4V 58V SMA(DO-214AC) TVS ROHS", LCSC Part Number=C698958, Manufacturer="Yangzhou Yangjie Elec Tech", Package=SMA(DO-214AC), ComponentLink1Description=LCSC, ComponentLink1URL=https://www.lcsc.com/product-detail/TVS_Yangzhou-Yangjie-Elec-Tech-SMAJ58A_C698958.html, Item Type=Diode, Manufacturer Part Number=SMAJ58A
D2: "SCHOTTKY DIODE SMB 100V 5A", LCSC Part Number=C3011128, Manufacturer=MDD, Package=SMB, ComponentLink1Description=LCSC, ComponentLink1URL=https://www.lcsc.com/product-detail/Schottky-Barrier-Diodes-SBD_JUXING-SS510B_C3011128.html, Item Type=Diode, Manufacturer Part Number=SS510B
D3 D4: "TVS DIODE 5.5VWM 8.5VC SOT23-3", LCSC Part Number=C207261, Manufacturer=Littelfuse, Supplier Part Number=5544929, Category="TVS Diodes", ComponentLink1Description=https://datasheet.ciiva.com/332/sp05xxba-332272.pdf?src-supplier=Digi-Key, ComponentLink1URL=https://datasheet.ciiva.com/332/sp05xxba-332272.pdf?src-supplier=Digi-Key, ComponentLink2Description=https://datasheet.ciiva.com/5771/littefuse-spa-sp050x-5771122.pdf?src-supplier=Farnell, ComponentLink2URL=https://datasheet.ciiva.com/5771/littefuse-spa-sp050x-5771122.pdf?src-supplier=Farnell, ComponentLink3Description=https://datasheet.ciiva.com/4508/sp05x-leadfree-4508925.pdf?src-supplier=Mouser, ComponentLink3URL=https://datasheet.ciiva.com/4508/sp05x-leadfree-4508925.pdf?src-supplier=Mouser, ComponentLink4Description=https://datasheet.ciiva.com/14536/70184671-14536037.pdf?src-supplier=Allied+Electronics, ComponentLink4URL=https://datasheet.ciiva.com/14536/70184671-14536037.pdf?src-supplier=Allied+Electronics, ComponentLink5Description=https://datasheet.ciiva.com/22735/526672-22735323.pdf?src-supplier=Element14, ComponentLink5URL=https://datasheet.ciiva.com/22735/526672-22735323.pdf?src-supplier=Element14, ComponentLink6Description=https://datasheet.ciiva.com/16392/sp05x-leadfree-16392807.pdf?src-supplier=Future+Electronics, ComponentLink6URL=https://datasheet.ciiva.com/16392/sp05x-leadfree-16392807.pdf?src-supplier=Future+Electronics, ComponentLink7Description=https://datasheet.ciiva.com/332/sp05xxba-332270.pdf?src-supplier=Digi-Key, ComponentLink7URL=https://datasheet.ciiva.com/332/sp05xxba-332270.pdf?src-supplier=Digi-Key, ComponentLink8Description=https://datasheet.ciiva.com/332/sp05xxba-332271.pdf?src-supplier=Digi-Key, ComponentLink8URL=https://datasheet.ciiva.com/332/sp05xxba-332271.pdf?src-supplier=Digi-Key, Item Type="TVS Diode", Manufacturer Part Number=SP0502BAHTG, Pricing="1=0.78, 15=0.685, 75=0.625, 300=0.575, 1500=0.52 (USD)", RoHS=Yes, Stock=1160, Supplier="Future Electronics"
F1: "6V 2A 50A 1W -40℃~+85℃ 4A 4mΩ 5s 45mΩ 0805 Resettable Fuses ROHS", LCSC Part Number=C2757931, Manufacturer=BHFUSE, Package=0805, ComponentLink1Description=LCSC, ComponentLink1URL=https://www.lcsc.com/product-detail/Resettable-Fuses_BHFUSE-BSMD0805L-200_C2757931.html, Item Type=Fuse, Manufacturer Part Number=BSMD0805L-200
FB1 FB2: "FERRITE BEAD 600 OHM 1210 1LN", Case Code (Imperial)=1210, Case Code (Metric)=3225, Current Rating=3A, DC Resistance (DCR)=42mR, Frequency=100MHz, LCSC Part Number=C268004, Manufacturer="Taiyo Yuden", Max Operating Temperature=125°C, Min Operating Temperature=-40°C, Package Quantity=1, Resistor Type="Ferrite Bead", Tolerance=30%, Case/Package=1210, Category="Ferrite Beads and Chips", ComponentLink1Description=https://datasheet.ciiva.com/6212/fbmh3225hm601nt-ss-6212657.pdf?src-supplier=Digi-Key, ComponentLink1URL=https://datasheet.ciiva.com/6212/fbmh3225hm601nt-ss-6212657.pdf?src-supplier=Digi-Key, ComponentLink2Description=https://datasheet.ciiva.com/16001/44fbmh3225hm601nt-16001086.pdf?src-supplier=Onlinecomponents.com, ComponentLink2URL=https://datasheet.ciiva.com/16001/44fbmh3225hm601nt-16001086.pdf?src-supplier=Onlinecomponents.com, ComponentLink3Description=https://datasheet.ciiva.com/25614/0900766b810b37be-25614375.pdf?src-supplier=Rs, ComponentLink3URL=https://datasheet.ciiva.com/25614/0900766b810b37be-25614375.pdf?src-supplier=Rs, ComponentLink4Description=https://datasheet.ciiva.com/7966/chipbeads01-e-7966154.pdf?src-supplier=Element14, ComponentLink4URL=https://datasheet.ciiva.com/7966/chipbeads01-e-7966154.pdf?src-supplier=Element14, ComponentLink5Description=https://datasheet.ciiva.com/1014/chipbeads01-e-1014606.pdf?src-supplier=Digi-Key, ComponentLink5URL=https://datasheet.ciiva.com/1014/chipbeads01-e-1014606.pdf?src-supplier=Digi-Key, ComponentLink6Description=https://datasheet.ciiva.com/1014/chipbeads01-e-1014605.pdf?src-supplier=Digi-Key, ComponentLink6URL=https://datasheet.ciiva.com/1014/chipbeads01-e-1014605.pdf?src-supplier=Digi-Key, Core Material=Ferrite, Depth=2.8mm, Halogen Free="Halogen Free", Height=2.8mm, Impedance=600R, Item Type="Ferrite Bead", Lead Free="Lead Free", Length=3.2mm, Manufacturer Part Number=FBMH3225HM601NT, Material=Ferrite, Max Current Rating=3A, Max DC Current=3A, Mounting Technology="Surface Mount", Number of Lines=1, Packaging="Tape and Reel", Pins=2, Pricing 1="1000=0.11115, 2000=0.10925, 4000=0.10735, 6000=0.10545, 8000=0.10355 (USD)", Reach SVHC Compliant=Yes, RoHS=Yes, RoHS Compliant=Yes, Series=FB, Shielding=Unshielded, Stock 1=56700, Supplier 1=Avnet, Supplier Part Number 1=FBMH3225HM601NT, Termination=SMD/SMT, Test Frequency=100MHz, Width=0.098inch
J1: "PCI Express Mini Card (Mini PCIe)"
J2: "CONN JACK 1PORT 100 BASE-T PCB", Color=Green,Yellow, Manufacturer=Abracon, Max Operating Temperature=85°C, Min Operating Temperature=-40°C, Supplier Part Number 1=815-RJM11D7114ABEW2, Category="Modular / Ethernet Connectors", ComponentLink1Description=https://abracon.com/Magnetics/ARJM11.pdf?src-supplier=Digi-Key, ComponentLink1URL=https://abracon.com/Magnetics/ARJM11.pdf?src-supplier=Digi-Key, Connector Type=RJ45, Contact Plating=Gold, Direction=Up, Item Type="Ethernet Connector", Manufacturer Part Number=ARJM11D7-114-AB-EW2, Mounting Technology="Through Hole", Number of Cores per Jack=4, Number of Ports=1, Number of Rows=1, Packaging=Tray, Pricing 1="1=3.42, 10=3.29, 50=2.88, 100=2.73, 1000=1.98, 10000=1.77 (USD)", RoHS=Yes, RoHS Compliant=Yes, Series=ARJM11, Shielding=Shielded, Stock 1=4503, Supplier 1=Mouser, Termination=Solder
L1: library part MDA7050-330M, "33uH 2.3A ±20% SMD,6.6x7.3mm Inductors", LCSC Part Number=C2847546, Manufacturer=KOHERelec, Package=SMD,6.6x7.3mm, ComponentLink1Description=LCSC, ComponentLink1URL=https://www.lcsc.com/product-detail/Inductors-SMD_KOHERelec-MDA7050-330M_C2847546.html, Item Type=Inductor, Manufacturer Part Number=MDA7050-330M
Q1: "40V 100mW 100@10mA,1V 200mA 300MHz 300mV@50mA,5mA NPN -55℃~+150℃@(Tj) SOT-723 Bipolar Transistors - BJT ROHS", LCSC Part Number=C2923360, Manufacturer="TECH PUBLIC", Package=SOT-723, ComponentLink1Description=LCSC, ComponentLink1URL=https://www.lcsc.com/product-detail/Bipolar-Transistors-BJT_TECH-PUBLIC-MMBT3904M_C2923360.html, Item Type=Mosfet, Manufacturer Part Number=MMBT3904M
Q2: "MOSFET P-CH 12V 2.6A SUPERSOT3", Case/Package=TO-236-3, Continuous Drain Current (ID)=2.6A, Current=26A, Current Rating=-2.6A, Drain to Source Breakdown Voltage=-12V, Drain to Source Resistance=40mR, Drain to Source Voltage (Vdss)=12V, Drain-source On Resistance-Max=40MR, Gate to Source Voltage (Vgs)=8V, Input Capacitance=1.138nF, LCSC Part Number=C725031, Manufacturer="ON Semiconductor / Fairchild", Max Operating Temperature=150°C, Max Power Dissipation=500mW, Min Operating Temperature=-55°C, Package Quantity=3000, Supplier Part Number 1=FDN306PCT-ND, Threshold Voltage=-600mV, Category=MOSFETs, ComponentLink1Description=https://datasheet.ciiva.com/6383/fdn306p-6383301.pdf?src-supplier=Digi-Key, ComponentLink1URL=https://datasheet.ciiva.com/6383/fdn306p-6383301.pdf?src-supplier=Digi-Key, ComponentLink2Description=https://datasheet.ciiva.com/4439/fdn306p-50876-4439911.pdf?src-supplier=Mouser, ComponentLink2URL=https://datasheet.ciiva.com/4439/fdn306p-50876-4439911.pdf?src-supplier=Mouser, ComponentLink3Description=https://datasheet.ciiva.com/27050/889760-27050636.pdf?src-supplier=Jameco, ComponentLink3URL=https://datasheet.ciiva.com/27050/889760-27050636.pdf?src-supplier=Jameco, ComponentLink4Description=https://datasheet.ciiva.com/14170/fdn306p-eng-tds-14170925.pdf?src-supplier=Distrelec, ComponentLink4URL=https://datasheet.ciiva.com/14170/fdn306p-eng-tds-14170925.pdf?src-supplier=Distrelec, ComponentLink5Description=https://datasheet.ciiva.com/22700/264983-22700885.pdf?src-supplier=Element14, ComponentLink5URL=https://datasheet.ciiva.com/22700/264983-22700885.pdf?src-supplier=Element14, ComponentLink6Description=https://datasheet.ciiva.com/26144/fdn306p-26144214.pdf?src-supplier=Avnet+Europe, ComponentLink6URL=https://datasheet.ciiva.com/26144/fdn306p-26144214.pdf?src-supplier=Avnet+Europe, ComponentLink7Description=https://datasheet.ciiva.com/6383/fdn306p-6383304.pdf?src-supplier=Digi-Key, ComponentLink7URL=https://datasheet.ciiva.com/6383/fdn306p-6383304.pdf?src-supplier=Digi-Key, ComponentLink8Description=https://datasheet.ciiva.com/11175/fdn306p-11175160.pdf?src-supplier=Avnet, ComponentLink8URL=https://datasheet.ciiva.com/11175/fdn306p-11175160.pdf?src-supplier=Avnet, ComponentLink9Description=https://datasheet.ciiva.com/6383/fdn306p-6383306.pdf?src-supplier=Digi-Key, ComponentLink9URL=https://datasheet.ciiva.com/6383/fdn306p-6383306.pdf?src-supplier=Digi-Key, ComponentLink10Description=https://datasheet.ciiva.com/17275/fdn306p-17275114.pdf?src-supplier=Future+Electronics, ComponentLink10URL=https://datasheet.ciiva.com/17275/fdn306p-17275114.pdf?src-supplier=Future+Electronics, ComponentLink11Description=https://datasheet.ciiva.com/22655/fdn306p-22655327.pdf?src-supplier=Element14, ComponentLink11URL=https://datasheet.ciiva.com/22655/fdn306p-22655327.pdf?src-supplier=Element14, Contact Plating=Tin,Matte, Dual Supply Voltage=-12V, Element Configuration=Single, Fall Time=10ns, Height=0.94mm, Lead Free="Lead Free", Length=2.92mm, Manufacturer Part Number=FDN306P, Mount="Surface Mount", Nominal Vgs=-600mV, Number of Elements=1, Number of Pins=3, On-State Resistance=40MR, Packaging="Tape and Reel", Polarity=P-CHANNEL, Power Dissipation=500mW, Pricing 1="1=0.59000, 10=0.50700, 25=0.47360, 100=0.37880, 500=0.29766, 1000=0.23001 (USD)", Radiation Hardening=No, Rds On Max=40mR, REACH SVHC="No SVHC", Rise Time=10ns, RoHS=Yes, RoHS Compliant=Yes, Series=PowerTrench®, Stock 1=12409, Supplier 1=Digi-Key, Termination=SMD/SMT, Turn-Off Delay Time=38ns, Turn-On Delay Time=11ns, Voltage=12V, Voltage Rating (DC)=-12V, Width=1.4mm
R1: library part NQ01WMJ047JTEE, "50mW ±5% -100ppm/℃~+350ppm/℃ 4.7Ω 0201 Chip Resistor - Surface Mount ROHS", LCSC Part Number=C965309, Manufacturer=UNI-ROYAL, Package=0201, ComponentLink1Description=LCSC, ComponentLink1URL=https://www.lcsc.com/product-detail/Chip-Resistor-Surface-Mount_UNI-ROYAL-Uniroyal-Elec-NQ01WMJ047JTEE_C965309.html, Item Type=Resistor, Manufacturer Part Number=NQ01WMJ047JTEE
R2: library part RC0201DR-0724K9L, "RES 24.9K OHM 0.5% 1/20W 0201", Case/Package=0201, LCSC Part Number=C851690, Manufacturer=Yageo, Max Operating Temperature=125°C, Max Power Dissipation=50mW, Min Operating Temperature=-55°C, Supplier Part Number 1=RC0201DR-0724K9L-ND, Temperature Coefficient=200ppm/°C, Tolerance=0.5%, Category="Chip SMD Resistors", ComponentLink1Description=http://www.yageo.com.tw/exep/pages/download/literatures/PYu-R_INT-thick_7.pdf?src-supplier=Digi-Key, ComponentLink1URL=http://www.yageo.com.tw/exep/pages/download/literatures/PYu-R_INT-thick_7.pdf?src-supplier=Digi-Key, Features="Moisture Resistant", Height=0.01inch, Item Type=Resistor, Length=0.024inch, Manufacturer Part Number=RC0201DR-0724K9L, Number of Terminations=2, Packaging="Tape and Reel", Pricing 1="10000=0.02267 (USD)", RoHS=Yes, RoHS Compliant=Yes, Series=RC, Supplier 1=Digi-Key, Width=0.012inch
R3 R11: library part RC0402FR-074K7L, "RES 4.7K OHM 1% 1/16W 0402", Case Code (Imperial)=0402, Case Code (Metric)=1005, LCSC Part Number=C105871, Manufacturer=Yageo, Max Operating Temperature=155°C, Max Power Dissipation=63mW, Min Operating Temperature=-55°C, Power Rating=62.5mW, Resistance=4.7kR, Resistance Tolerance=1%, Resistor Type="Thick Film", Temperature Coefficient=100ppm/°C, Voltage Rating=50V, Case/Package=0402, Category="Chip SMD Resistors", ComponentLink1Description=https://datasheet.ciiva.com/22661/1686128-22661342.pdf?src-supplier=Element14, ComponentLink1URL=https://datasheet.ciiva.com/22661/1686128-22661342.pdf?src-supplier=Element14, ComponentLink2Description=https://datasheet.ciiva.com/7850/1018594-7850022.pdf?src-supplier=Element14, ComponentLink2URL=https://datasheet.ciiva.com/7850/1018594-7850022.pdf?src-supplier=Element14, ComponentLink3Description=https://datasheet.ciiva.com/7850/1018594-7850023.pdf?src-supplier=Element14, ComponentLink3URL=https://datasheet.ciiva.com/7850/1018594-7850023.pdf?src-supplier=Element14, ComponentLink4Description=https://datasheet.ciiva.com/15215/getdatasheetpartid-328119-15215035.pdf?src-supplier=Verical, ComponentLink4URL=https://datasheet.ciiva.com/15215/getdatasheetpartid-328119-15215035.pdf?src-supplier=Verical, Construction=Rectangular, Depth=0.5mm, Features="Moisture Resistant", Height=0.32mm, Height - Seated (Max)=0.016inch, Item Type=Resistor, Lead Free="Lead Free", Length=1mm, Manufacturer Part Number=RC0402FR-074K7L, Military Standard=Not, Number of Pins=2, Number of Terminations=2, Packaging="Tape and Reel", Pricing 1="10000=0.00085 (USD)", Reach SVHC Compliant=Yes, RoHS=Yes, RoHS Compliant=Yes, Series=RC, Size Code=0402, Stock 1=2420000, Supplier 1=Avnet, Supplier Part Number 1=RC0402FR-074K7L, Termination=SMD/SMT, Tolerance=1%, Voltage Rating (DC)=50V, Width=0.5mm
R4: library part PE0805FRF470R03L, "RES 0.03 OHM 1% 1/2W 0805", Case/Package=0805, LCSC Part Number=C858599, Manufacturer=Yageo, Max Operating Temperature=170°C, Max Power Dissipation=500mW, Min Operating Temperature=-55°C, Package Quantity=5000, Supplier Part Number 1=7123965, Temperature Coefficient=100ppm/°C, Tolerance=1%, Category="Chip SMD Resistors", ComponentLink1Description=http://www.mouser.com/ds/2/447/PYu-PE_521_RoHS_L_5-1077989.pdf?src-supplier=Mouser, ComponentLink1URL=http://www.mouser.com/ds/2/447/PYu-PE_521_RoHS_L_5-1077989.pdf?src-supplier=Mouser, ComponentLink2Description=http://www.yageo.com/documents/recent/PYu-PE_521_RoHS_L_5.pdf?src-supplier=Digi-Key, ComponentLink2URL=http://www.yageo.com/documents/recent/PYu-PE_521_RoHS_L_5.pdf?src-supplier=Digi-Key, Features="Moisture Resistant,Automotive AEC-Q200", Height=0.024inch, Item Type=Resistor, Length=0.08inch, Manufacturer Part Number=PE0805FRF470R03L, Number of Terminations=2, Packaging="Tape and Reel", Pricing 1="5000=0.175, 10000=0.171, 15000=0.169, 20000=0.168, 25000=0.164 (USD)", RoHS=Yes, RoHS Compliant=Yes, Series=PE, Stock 1=20000, Supplier 1="Future Electronics", Width=0.05inch
R5: library part RC0201JR-07180KL, "RES 180K OHM 5% 1/20W 0201", Case Code (Imperial)=0201, Case Code (Metric)=0603, LCSC Part Number=C295837, Manufacturer=Yageo, Max Operating Temperature=125°C, Max Power Dissipation=50mW, Min Operating Temperature=-55°C, Package Quantity=10000, Supplier Part Number 1=7244643, Temperature Coefficient=200ppm/°C, Tolerance=5%, Voltage Rating=25V, Case/Package=0201, Category="Chip SMD Resistors", ComponentLink1Description=https://datasheet.ciiva.com/14986/pyu-r-int-thick-7-14986685.pdf?src-supplier=Digi-Key, ComponentLink1URL=https://datasheet.ciiva.com/14986/pyu-r-int-thick-7-14986685.pdf?src-supplier=Digi-Key, Contact Plating=Tin,Matte, Features="Moisture Resistant", Height=0.01inch, Item Type=Resistor, Lead Free="Lead Free", Length=0.024inch, Manufacturer Part Number=RC0201JR-07180KL, Number of Terminations=2, Packaging="Tape and Reel", Power Rating=50mW, Pricing 1="10000=0.0012, 50000=0.0011, 250000=0.0011, 1000000=0.001, 2500000=0.0009 (USD)", RoHS=Yes, RoHS Compliant=Yes, Series=RC, Stock 1=50000, Supplier 1="Future Electronics", Termination=SMD/SMT, Width=0.3mm
R6: library part 0201WMF4421TEE, "4.42kΩ 0201 Chip Resistor - Surface Mount ROHS", LCSC Part Number=C423515, Manufacturer=UNI-ROYAL, Package=0201, ComponentLink1Description=LCSC, ComponentLink1URL=https://www.lcsc.com/product-detail/Chip-Resistor-Surface-Mount_UNI-ROYAL-Uniroyal-Elec-0201WMF4421TEE_C423515.html, Item Type=Resistor, Manufacturer Part Number=0201WMF4421TEE
R7: library part CRCW060322R0JNEAHP, "RES SMD 22 OHM 5% 1/3W 0603", Case Code (Imperial)=0603, Case Code (Metric)=1608, Manufacturer="Vishay Dale", Max Operating Temperature=155°C, Min Operating Temperature=-55°C, Package Quantity=5000, Power Rating=250mW, Supplier Part Number 1=541-22SACT-ND, Temperature Coefficient=200ppm/°C, Tolerance=5%, Voltage Rating=75V, Case/Package=0603, ComponentLink1Description=http://www.vishay.com/docs/20043/crcwhpe3.pdf?src-supplier=Avnet+Europe, ComponentLink1URL=http://www.vishay.com/docs/20043/crcwhpe3.pdf?src-supplier=Avnet+Europe, ComponentLink2Description=http://www.mouser.com/ds/2/427/dcrcwe3-109170.pdf?src-supplier=Mouser, ComponentLink2URL=http://www.mouser.com/ds/2/427/dcrcwe3-109170.pdf?src-supplier=Mouser, Composition="Thick Film", Contact Plating=Tin, Depth=0.85mm, Height=0.45mm, Lead Free="Lead Free", Length=1.6mm, Manufacturer Part Number=CRCW060322R0JNEAHP, Military Standard=Not, Mount="Surface Mount", Packaging="Tape and Reel", Pricing 1="1=0.15, 10=0.129, 100=0.0506, 1000=0.02119, 2500=0.01942 (USD)", Radiation Hardening=No, Resistance=22R, Stock 1=245392, Supplier 1=Digi-Key, Weight=7.1E-05oz, Width=0.8mm
R8: library part RC0201FR-07300KL, "RES 300K OHM 1% 1/20W 0201", Case Code (Imperial)=0201, Case Code (Metric)=0603, LCSC Part Number=C274871, Manufacturer=Yageo, Max Operating Temperature=125°C, Max Power Dissipation=50mW, Min Operating Temperature=-55°C, Temperature Coefficient=200ppm/°C, Tolerance=1%, Case/Package=0201, Category="Chip SMD Resistors", ComponentLink1Description=https://datasheet.ciiva.com/26829/getdatasheetpartid-732987-26829861.pdf?src-supplier=Verical, ComponentLink1URL=https://datasheet.ciiva.com/26829/getdatasheetpartid-732987-26829861.pdf?src-supplier=Verical, Construction=Rectangular, Depth=0.3mm, Features="Moisture Resistant", Item Type=Resistor, Length=0.6mm, Manufacturer Part Number=RC0201FR-07300KL, Military Standard=Not, Number of Terminations=2, Packaging="Tape and Reel", Pricing 1="10000=0.0017, 50000=0.0016 (USD)", RoHS=Yes, RoHS Compliant=Yes, Series=RC, Stock 1=230000, Supplier 1="Arrow Electronics", Supplier Part Number 1=RC0201FR-07300KL
R9: library part RC0201DR-0757K6L, "RES 57.6K OHM 0.5% 1/20W 0201", Case/Package=0201, LCSC Part Number=C851763, Manufacturer=Yageo, Max Operating Temperature=125°C, Max Power Dissipation=50mW, Min Operating Temperature=-55°C, Supplier Part Number 1=RC0201DR-0757K6L-ND, Temperature Coefficient=200ppm/°C, Tolerance=0.5%, Category="Chip SMD Resistors", ComponentLink1Description=http://www.yageo.com.tw/exep/pages/download/literatures/PYu-R_INT-thick_7.pdf?src-supplier=Digi-Key, ComponentLink1URL=http://www.yageo.com.tw/exep/pages/download/literatures/PYu-R_INT-thick_7.pdf?src-supplier=Digi-Key, Features="Moisture Resistant", Height=0.01inch, Item Type=Resistor, Length=0.024inch, Manufacturer Part Number=RC0201DR-0757K6L, Number of Terminations=2, Packaging="Tape and Reel", Pricing 1="10000=0.02267 (USD)", RoHS=Yes, RoHS Compliant=Yes, Series=RC, Supplier 1=Digi-Key, Width=0.012inch
R10 R14 R23 R25 R29 R30 R31 R34 R35 R36 R37 R38 R39: library part RC0201FR-0710KL, "RES SMD 10K OHM 1% 1/20W 0201", LCSC Part Number=C106225, Manufacturer=Yageo, Package=0201, ComponentLink7Description=LCSC, ComponentLink7URL=https://www.lcsc.com/product-detail/Chip-Resistor-Surface-Mount_YAGEO-RC0201FR-0710KL_C106225.html, Item Type=Resistor, Manufacturer Part Number=RC0201FR-0710KL
R12 R17 R33: library part RC0603FR-070RL, "RES SMD 0R, 1%, 0.1W, 0603", LCSC Part Number=C100044, Manufacturer=Yageo, Package=0603, ComponentLink9Description=LCSC, ComponentLink9URL=https://www.lcsc.com/product-detail/Chip-Resistor-Surface-Mount_YAGEO-RC0603FR-070RL_C100044.html, Item Type=Resistor, Manufacturer Part Number=RC0603FR-070RL